# Altium PCB OFP_MCM_v1.62.PcbDoc (part 2 of 8)
Units mil, origin at the board's own origin, x right, y up, seen from the top; angles counter-clockwise.
Board outline 4330.71 x 4724.41 mil, 4 copper layers (Top Layer, Layer 1, Layer 2, Bottom Layer), stack 62.047 mil thick; 385 components, 287 nets, 1341 pads, 554 vias.
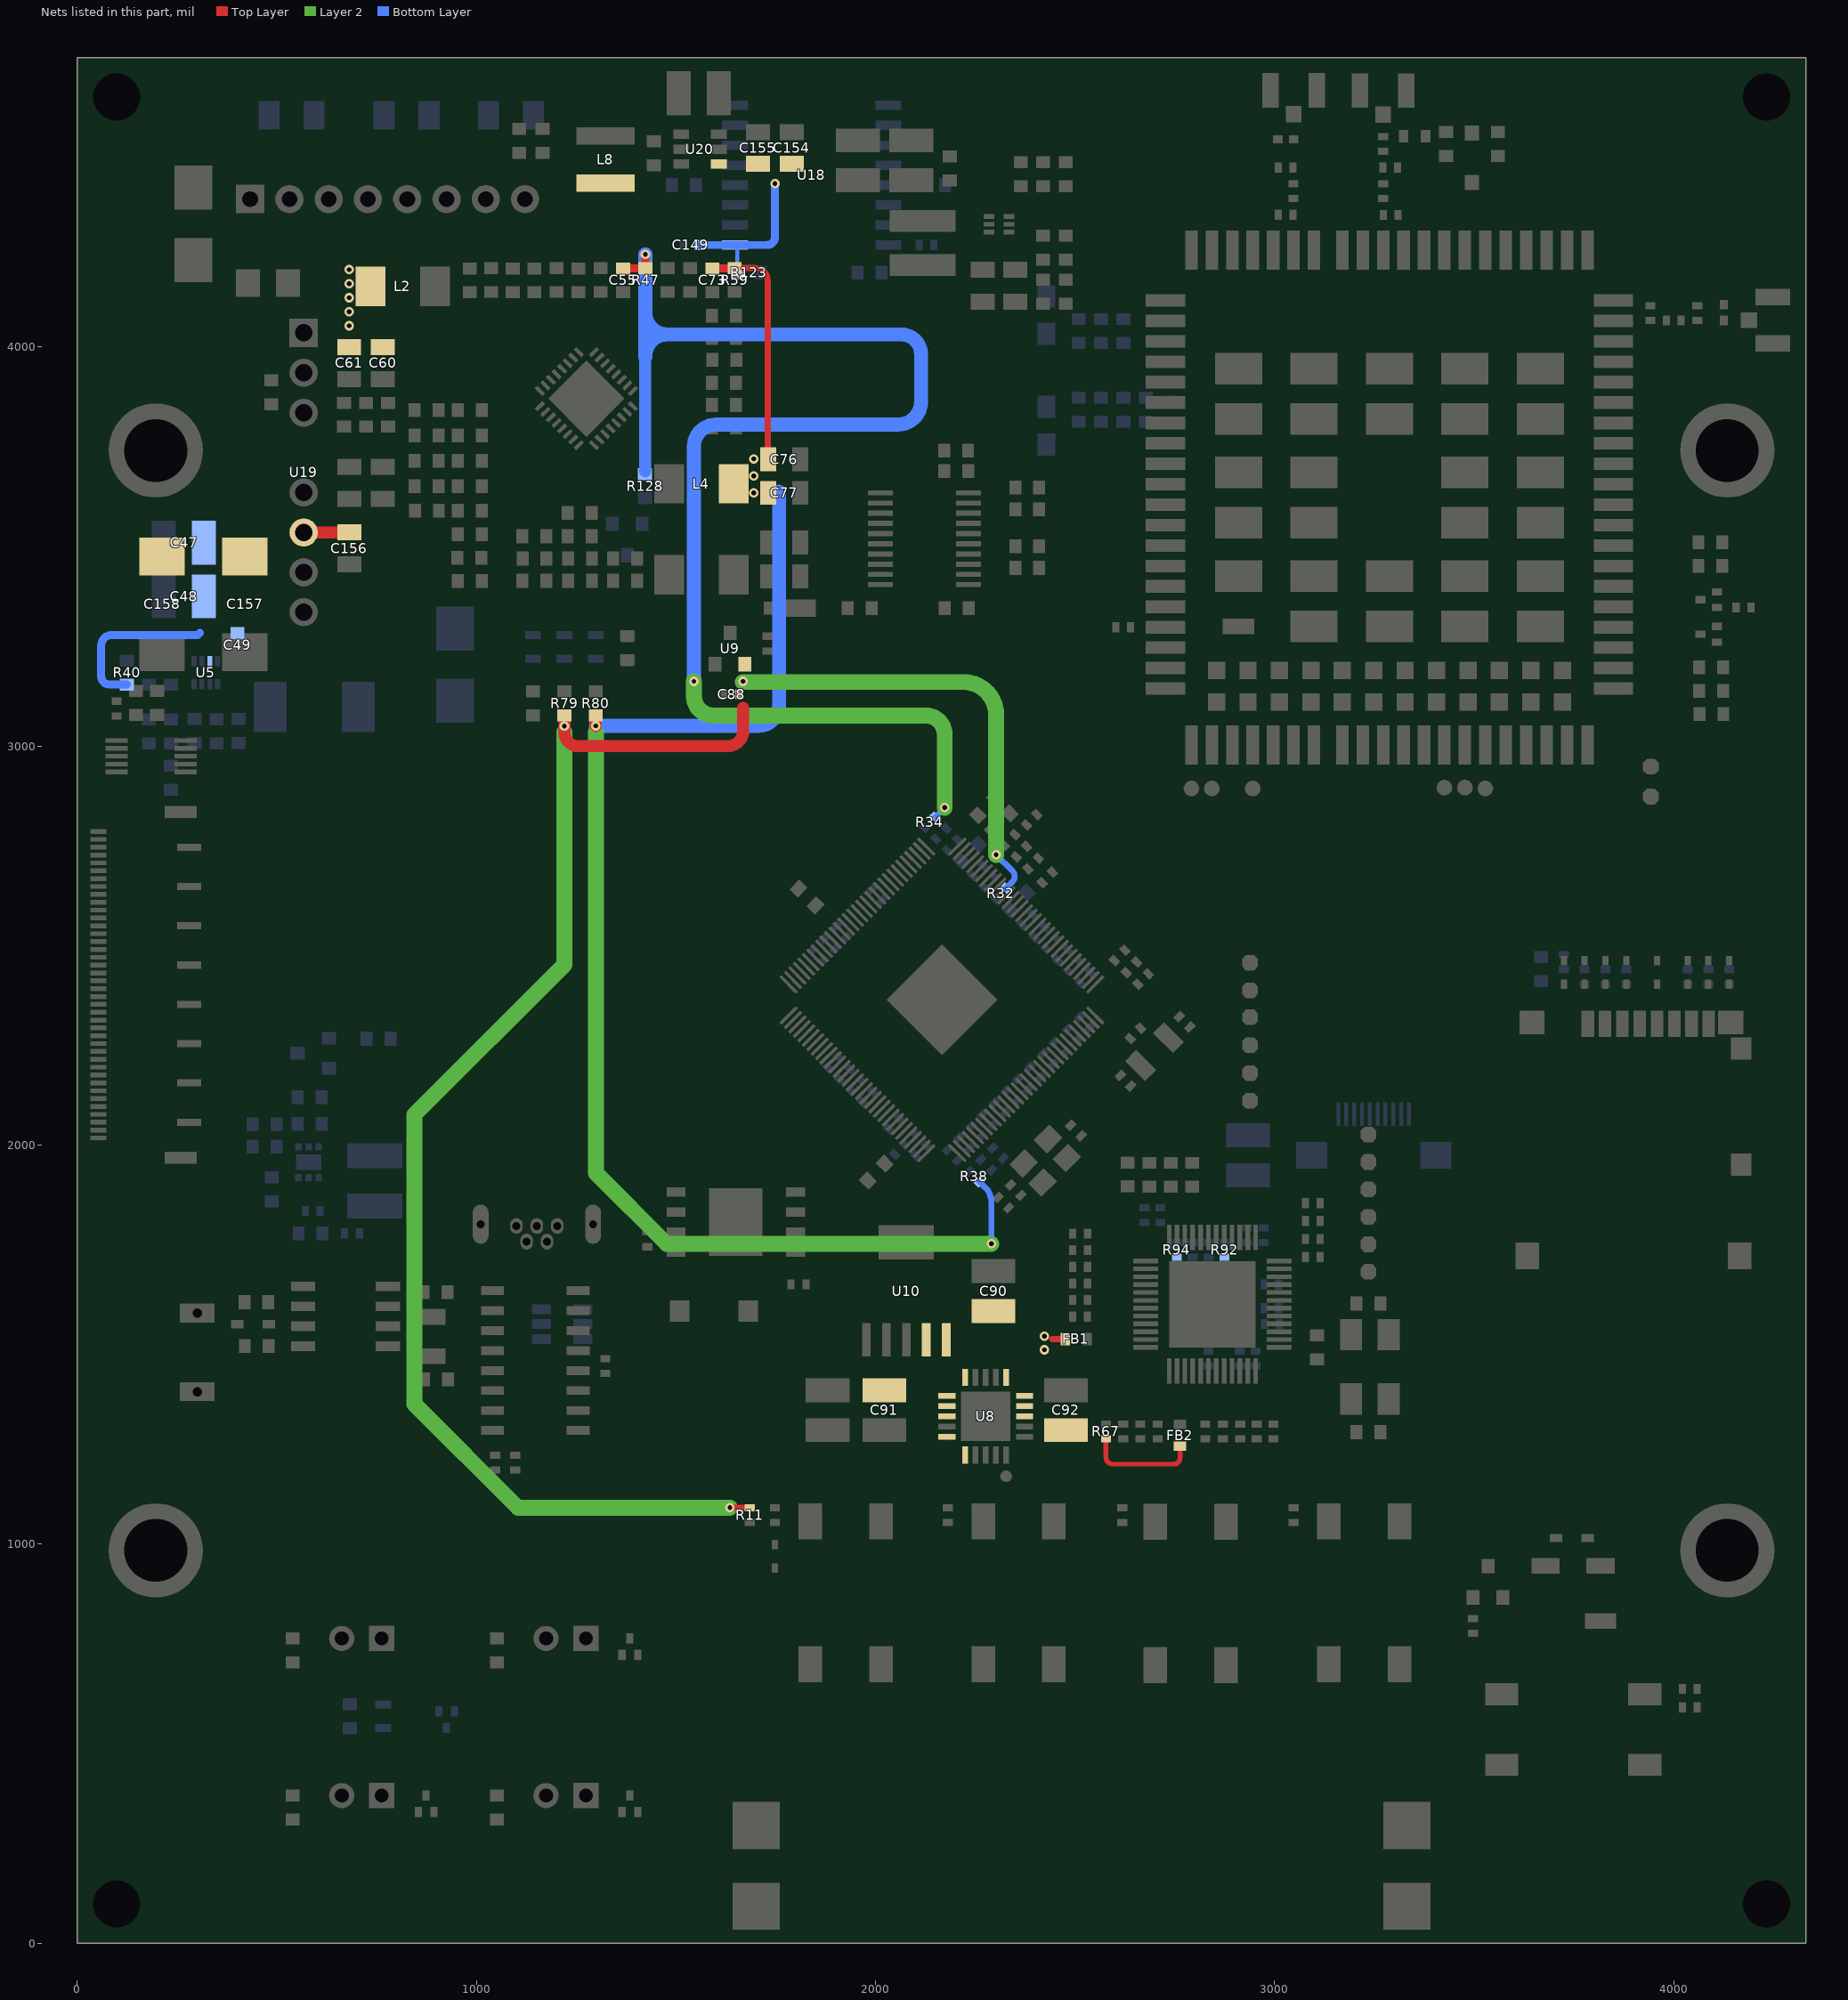
[diagram p4: the nets of this part, all layers, seen from the top]

## Part data
C1 C2 C5 C6: library part GJM1555C1H150FB01D, "CAP CER 15PF 50V C0G/NP0 0402", LCSC Part Number=C441742, Manufacturer=Murata, Temperature Coefficient=30ppm/°C, ComponentLink1Description=https://datasheet.ciiva.com/11608/c02e-11608383.pdf?src-supplier=Avnet, ComponentLink1URL=https://datasheet.ciiva.com/11608/c02e-11608383.pdf?src-supplier=Avnet, Item Type=Capacitors, Manufacturer Part Number=GJM1555C1H150FB01D, Material=4241ConductorMaterial, Pricing="1=0.15, 10=0.054, 50=0.054, 100=0.035, 1000=0.03, 10000=0.023 (USD)", RoHS=Yes, Stock=44169, Supplier=Mouser
C3 C17 C22 C23 C34 C38 C42 C45 C87 C88: library part GRM155R70J105KA12J, "CAP CER 1UF 6.3V X7R 0402", Case Code (Imperial)=0402, Case Code (Metric)=1005, Dielectric=X7R, LCSC Part Number=C2167130, Manufacturer=Murata, Max Operating Temperature=125°C, Min Operating Temperature=-55°C, Package Quantity=50000, Tolerance=10%, Voltage Rating=6.3V, Case/Package=0402, ComponentLink1Description=http://www.mouser.com/ds/2/281/c02e-2905.pdf?src-supplier=Mouser, ComponentLink1URL=http://www.mouser.com/ds/2/281/c02e-2905.pdf?src-supplier=Mouser, ComponentLink2Description=https://datasheet.octopart.com/GRM155R70J105KA12J-Murata-datasheet-32479577.pdf?src-supplier=Future+Electronics, ComponentLink2URL=https://datasheet.octopart.com/GRM155R70J105KA12J-Murata-datasheet-32479577.pdf?src-supplier=Future+Electronics, ComponentLink3Description=https://datasheet.octopart.com/GRM155R70J105KA12J-Murata-datasheet-155345054.pdf?src-supplier=Element14, ComponentLink3URL=https://datasheet.octopart.com/GRM155R70J105KA12J-Murata-datasheet-155345054.pdf?src-supplier=Element14, ComponentLink4Description=http://search.murata.co.jp/Ceramy/image/img/A01X/G101/ENG/GRM155R70J105KA12-01.pdf?src-supplier=Digikey, ComponentLink4URL=http://search.murata.co.jp/Ceramy/image/img/A01X/G101/ENG/GRM155R70J105KA12-01.pdf?src-supplier=Digikey, ComponentLink5Description=https://datasheet.octopart.com/GRM155R70J105KA12J-Murata-datasheet-165579666.pdf?src-supplier=TME, ComponentLink5URL=https://datasheet.octopart.com/GRM155R70J105KA12J-Murata-datasheet-165579666.pdf?src-supplier=TME, Height=550um, Item Type=Capacitors, Length=0.039inch, Manufacturer Part Number=GRM155R70J105KA12J, Material=4241ConductorMaterial, Mounting Technology="Surface Mount", Packaging="Tape and Reel", Pins=2NUMBER, Pricing="1=0.1, 10=0.01, 50=0.01, 100=0.008, 1000=0.008, 10000=0.007 (USD)", RoHS=Yes, RoHS Compliant=Yes, Series=GRM, Stock=273640, Supplier=Mouser, Termination=SMD/SMT, Thickness=0.022inch, Voltage Rating (DC)=6.3V, Weight=0.000212oz, Width=0.02inch
C4 C11 C16 C20 C33 C37 C41 C57 C58 C93 C94: library part GRM188Z71A106KA73D, "CAP CER 10UF 10V X7R 0603", Case/Package=345Case, LCSC Part Number=C2959727, Manufacturer=Murata, Max Operating Temperature=125°C, Min Operating Temperature=-55°C, Tolerance=10%, Voltage Rating=10V, ComponentLink1Description=https://datasheet.octopart.com/GRM188Z71A106KA73D-Murata-datasheet-165579666.pdf?src-supplier=TME, ComponentLink1URL=https://datasheet.octopart.com/GRM188Z71A106KA73D-Murata-datasheet-165579666.pdf?src-supplier=TME, Height=1mm, Item Type=Capacitor, Length=1.6mm, Manufacturer Part Number=GRM188Z71A106KA73D, Material=4241ConductorMaterial, Pricing="1=0.36, 10=0.155, 50=0.155, 100=0.104, 1000=0.094, 10000=0.065 (USD)", RoHS=Yes, RoHS Compliant=Yes, Stock=390983, Supplier=Mouser, Thickness=800um, Width=800um
C7 C12 C13 C14 C15 C18 C19 C24 C27 C28 C29 C30 C31 C35 C36 C39 C40 C43 C44 C46 C95 C97 C111 C114 C117 C120 C124 C127 C130 C133 C149 C150: library part GRM155R71E104KE14D, "CAP CER 0.1UF 25V X7R 0402", Case Code (Imperial)=0402, Case Code (Metric)=1005, Dielectric=X7R, Dielectric Material=Ceramic, LCSC Part Number=C77014, Manufacturer=Murata, Max Operating Temperature=125°C, Min Operating Temperature=-55°C, Package Quantity=10000, Tolerance=10%, Voltage=25V, Case/Package=0402, ComponentLink1Description=http://www.farnell.com/datasheets/1872206.pdf?src-supplier=Farnell, ComponentLink1URL=http://www.farnell.com/datasheets/1872206.pdf?src-supplier=Farnell, ComponentLink2Description=http://www.mouser.com/ds/2/281/c02e-2905.pdf?src-supplier=Mouser, ComponentLink2URL=http://www.mouser.com/ds/2/281/c02e-2905.pdf?src-supplier=Mouser, ComponentLink3Description=http://uk.rs-online.com/webdocs/144c/0900766b8144c113.pdf?src-supplier=Rs, ComponentLink3URL=http://uk.rs-online.com/webdocs/144c/0900766b8144c113.pdf?src-supplier=Rs, ComponentLink4Description=https://datasheet.octopart.com/GRM155R71E104KE14D-Murata-datasheet-62346597.pdf?src-supplier=Future+Electronics, ComponentLink4URL=https://datasheet.octopart.com/GRM155R71E104KE14D-Murata-datasheet-62346597.pdf?src-supplier=Future+Electronics, ComponentLink5Description=https://search.murata.co.jp/Ceramy/image/img/A01X/G101/ENG/GRM155R71E104KE14-01.pdf?src-supplier=Digikey, ComponentLink5URL=https://search.murata.co.jp/Ceramy/image/img/A01X/G101/ENG/GRM155R71E104KE14-01.pdf?src-supplier=Digikey, ComponentLink6Description=http://www.farnell.com/datasheets/2048008.pdf?src-supplier=Newark, ComponentLink6URL=http://www.farnell.com/datasheets/2048008.pdf?src-supplier=Newark, ComponentLink7Description=https://datasheet.octopart.com/GRM155R71E104KE14D-Murata-datasheet-62317124.pdf?src-supplier=Element14, ComponentLink7URL=https://datasheet.octopart.com/GRM155R71E104KE14D-Murata-datasheet-62317124.pdf?src-supplier=Element14, ComponentLink8Description=http://psearch.en.murata.com/capacitor/product/GRM155R71E104KE14%23.pdf?src-supplier=Avnet, ComponentLink8URL=http://psearch.en.murata.com/capacitor/product/GRM155R71E104KE14%23.pdf?src-supplier=Avnet, Depth=0.5mm, Height=0.5mm, Item Type=Capacitors, Lead Free=5697LeadFree, Length=1mm, Manufacturer Part Number=GRM155R71E104KE14D, Material=4241ConductorMaterial, Mounting Technology="Surface Mount", Packaging="Tape and Reel", Pins=2NUMBER, Pricing="1=0.1, 10=0.007, 50=0.007, 100=0.005, 1000=0.005, 10000=0.004 (USD)", Reach SVHC Compliant=Unknown, RoHS=Yes, RoHS Compliant=Yes, Series=GRM, Stock=652368, Supplier=Mouser, Termination=SMD/SMT, Thickness=0.022inch, Voltage Rating=25V, Voltage Rating (DC)=25V, Weight=0.000212oz, Width=0.02inch
C8: library part "SC EB 5R5 474 M", "0.47F -20%~+80% 5.5V", LCSC Part Number=C239004, Manufacturer=Wincap(Xingkai), Package=Custom, ComponentLink1Description=LCSC, ComponentLink1URL=https://item.szlcsc.com/238113.html, Item Type="Super Capaciitor", Manufacturer Part Number="SC EB 5R5 474 M"
C9 C49 C52 C53 C59 C75 C80 C83 C101 C106 C139 C140 C143 C151: library part GCJ188R71H104KA12D, "CAP CER 0.1UF 50V X7R 0603", Case Code (Imperial)=0603, Case Code (Metric)=1608, Dielectric=X7R, LCSC Part Number=C161115, Manufacturer=Murata, Max Operating Temperature=125°C, Min Operating Temperature=-55°C, Package Quantity=1, Ratings=AEC-Q200, Tolerance=10%, Voltage Rating=50V, Case/Package=0603, ComponentLink1Description=https://datasheet.ciiva.com/135/product-135604.pdf?src-supplier=Digikey, ComponentLink1URL=https://datasheet.ciiva.com/135/product-135604.pdf?src-supplier=Digikey, ComponentLink2Description=https://datasheet.ciiva.com/26889/getdatasheetpartid-369886-26889118.pdf?src-supplier=Verical, ComponentLink2URL=https://datasheet.ciiva.com/26889/getdatasheetpartid-369886-26889118.pdf?src-supplier=Verical, ComponentLink3Description=https://datasheet.ciiva.com/135/s0717e-135605.pdf?src-supplier=Digikey, ComponentLink3URL=https://datasheet.ciiva.com/135/s0717e-135605.pdf?src-supplier=Digikey, ComponentLink4Description=https://datasheet.ciiva.com/135/s0717e-135606.pdf?src-supplier=Digikey, ComponentLink4URL=https://datasheet.ciiva.com/135/s0717e-135606.pdf?src-supplier=Digikey, ComponentLink5Description=https://datasheet.ciiva.com/16440/c03e-16440425.pdf?src-supplier=Future+Electronics, ComponentLink5URL=https://datasheet.ciiva.com/16440/c03e-16440425.pdf?src-supplier=Future+Electronics, Construction=Flat, Depth=0.8mm, Features="Soft Termination", Height=0.8mm, Item Type=Capacitors, Lead Free=5697LeadFree, Length=1.6mm, Manufacturer Part Number=GCJ188R71H104KA12D, Material=4241ConductorMaterial, Mounting Technology="Surface Mount", Packaging="Tape and Reel", Pricing="1=0.13, 10=0.056, 50=0.056, 100=0.036, 1000=0.032, 10000=0.02 (USD)", Radiation Hardening=No, RoHS=Yes, RoHS Compliant=Yes, Series=GCJ, Stock=342536, Supplier=Mouser, Termination=SMD/SMT, Thickness=0.035inch, Voltage Rating (DC)=50V, Width=0.031inch
C10: library part GCM1885C2A120JA16D, "CAP CER 12PF 100V C0G/NP0 0603", Case Code (Imperial)=0603, Case Code (Metric)=1608, Dielectric=C0G, LCSC Part Number=C701298, Manufacturer=Murata, Max Operating Temperature=125°C, Min Operating Temperature=-55°C, Package Quantity=4000, Ratings=AEC-Q200, Tolerance=5%, Voltage Rating=100V, Capacitance=12pF, Case/Package=0603, Category="Ceramic Capacitors", ComponentLink1Description=https://datasheet.ciiva.com/26843/getdatasheetpartid-298064-26843669.pdf?src-supplier=Verical, ComponentLink1URL=https://datasheet.ciiva.com/26843/getdatasheetpartid-298064-26843669.pdf?src-supplier=Verical, ComponentLink2Description=https://datasheet.ciiva.com/29541/s0717e-29541093.pdf?src-supplier=Digi-Key, ComponentLink2URL=https://datasheet.ciiva.com/29541/s0717e-29541093.pdf?src-supplier=Digi-Key, ComponentLink3Description=https://datasheet.ciiva.com/29541/s0717e-29541094.pdf?src-supplier=Digi-Key, ComponentLink3URL=https://datasheet.ciiva.com/29541/s0717e-29541094.pdf?src-supplier=Digi-Key, ComponentLink4Description=https://datasheet.ciiva.com/29541/s0717e-29541095.pdf?src-supplier=Digi-Key, ComponentLink4URL=https://datasheet.ciiva.com/29541/s0717e-29541095.pdf?src-supplier=Digi-Key, Construction=Flat, Depth=0.8mm, Height=0.8mm, Item Type=Capacitor, Lead Free="Lead Free", Length=1.6mm, Manufacturer Part Number=GCM1885C2A120JA16D, Mount="Surface Mount", Packaging="Tape and Reel", Pricing 1="4000=0.02030, 8000=0.01800, 12000=0.01680, 28000=0.01670, 100000=0.01630 (USD)", Radiation Hardening=No, RoHS=Yes, RoHS Compliant=Yes, Series=GCM, Stock 1=12000, Supplier 1="Arrow Electronics", Supplier Part Number 1=GCM1885C2A120JA16D, Termination=SMD/SMT, Thickness=0.035inch, Voltage Rating (DC)=100V, Width=0.031inch
C21 C25: library part CL05A475MO5NUNC, "CAP CER 4.7UF 16V X5R 0402", Case Code (Imperial)=0402, Case Code (Metric)=1005, Manufacturer=Samsung, Max Operating Temperature=85°C, Min Operating Temperature=-55°C, Tolerance=20%, Voltage Rating=16V, Capacitance=4.7uF, Case/Package=0402, Category="Ceramic Capacitors", ComponentLink1Description=http://www.farnell.com/datasheets/2710653.pdf?src-supplier=Farnell, ComponentLink1URL=http://www.farnell.com/datasheets/2710653.pdf?src-supplier=Farnell, ComponentLink2Description=http://www.samsungsem.com/kr/support/product-search/mlcc/CL05A475MO5NUNC.jsp?src-supplier=Digikey, ComponentLink2URL=http://www.samsungsem.com/kr/support/product-search/mlcc/CL05A475MO5NUNC.jsp?src-supplier=Digikey, ComponentLink3Description=http://www.farnell.com/datasheets/2710653.pdf?src-supplier=Element14, ComponentLink3URL=http://www.farnell.com/datasheets/2710653.pdf?src-supplier=Element14, ComponentLink4Description=https://datasheet.octopart.com/CL05A475MO5NUNC-Samsung-Electro-Mechanics-datasheet-123102911.pdf?src-supplier=Future+Electronics, ComponentLink4URL=https://datasheet.octopart.com/CL05A475MO5NUNC-Samsung-Electro-Mechanics-datasheet-123102911.pdf?src-supplier=Future+Electronics, ComponentLink5Description=http://www.farnell.com/datasheets/2710653.pdf?src-supplier=Newark, ComponentLink5URL=http://www.farnell.com/datasheets/2710653.pdf?src-supplier=Newark, Height=550um, Length=0.039inch, Manufacturer Part Number=CL05A475MO5NUNC, Material=4241ConductorMaterial, Mount="Surface Mount", Packaging="Cut Tape", Pricing 1="10000=0.09712 (USD)", RoHS=Yes, RoHS Compliant=Yes, Series=CL, Stock 1=50000, Supplier 1=Avnet, Supplier Part Number 1=CL05A475MO5NUNC, Thickness=0.022inch, Voltage Rating (DC)=16V, Width=0.02inch
C26: library part GRM1555C1H102JA01D, "CAP CER 1000PF 50V C0G/NP0 0402", Case Code (Imperial)=0402, Case Code (Metric)=1005, Dielectric=C0G, Dielectric Material=Ceramic, Insulation Resistance=10GR, LCSC Part Number=C76947, Manufacturer=Murata, Max Operating Temperature=125°C, Min Operating Temperature=-55°C, Package Quantity=1, Temperature Coefficient=30ppm/°C, Tolerance=5%, Voltage=50V, Capacitance=1nF, Case/Package=0402, Category="Ceramic Capacitors", ComponentLink1Description=https://datasheet.ciiva.com/34302/1855908-34302849.pdf?src-supplier=Jameco, ComponentLink1URL=https://datasheet.ciiva.com/34302/1855908-34302849.pdf?src-supplier=Jameco, ComponentLink2Description=https://datasheet.ciiva.com/132/product-132800.pdf?src-supplier=Digi-Key, ComponentLink2URL=https://datasheet.ciiva.com/132/product-132800.pdf?src-supplier=Digi-Key, ComponentLink3Description=https://datasheet.ciiva.com/132/grm1555c1h102ja01-01-132799.pdf?src-supplier=Digi-Key, ComponentLink3URL=https://datasheet.ciiva.com/132/grm1555c1h102ja01-01-132799.pdf?src-supplier=Digi-Key, ComponentLink4Description=https://datasheet.ciiva.com/11786/0900766b807a1cab-11786727.pdf?src-supplier=RSComponents, ComponentLink4URL=https://datasheet.ciiva.com/11786/0900766b807a1cab-11786727.pdf?src-supplier=RSComponents, ComponentLink5Description=https://datasheet.ciiva.com/29200/453569-da-01-en-vs-kondensator-0402-29200121.pdf?src-supplier=Conrad, ComponentLink5URL=https://datasheet.ciiva.com/29200/453569-da-01-en-vs-kondensator-0402-29200121.pdf?src-supplier=Conrad, ComponentLink6Description=https://datasheet.ciiva.com/7828/4360-7828821.pdf?src-supplier=Element14, ComponentLink6URL=https://datasheet.ciiva.com/7828/4360-7828821.pdf?src-supplier=Element14, ComponentLink7Description=https://datasheet.ciiva.com/14116/grmseries-tc-hitype-eng-14116919.pdf?src-supplier=Distrelec, ComponentLink7URL=https://datasheet.ciiva.com/14116/grmseries-tc-hitype-eng-14116919.pdf?src-supplier=Distrelec, ComponentLink8Description=https://datasheet.ciiva.com/14116/grmseries-tc-hitype-eng-14116858.pdf?src-supplier=Distrelec, ComponentLink8URL=https://datasheet.ciiva.com/14116/grmseries-tc-hitype-eng-14116858.pdf?src-supplier=Distrelec, ComponentLink9Description=https://datasheet.ciiva.com/132/grm1555c1h102ja01-01-132801.pdf?src-supplier=Digi-Key, ComponentLink9URL=https://datasheet.ciiva.com/132/grm1555c1h102ja01-01-132801.pdf?src-supplier=Digi-Key, ComponentLink10Description=https://datasheet.ciiva.com/7828/1747436-7828822.pdf?src-supplier=Element14, ComponentLink10URL=https://datasheet.ciiva.com/7828/1747436-7828822.pdf?src-supplier=Element14, Construction=Flat, Depth=0.5mm, Height=0.5mm, Item Type=Capacitor, Lead Free="Lead Free", Length=1mm, Manufacturer Part Number=GRM1555C1H102JA01D, Material=Ceramic, Mount="Surface Mount", Number of Pins=2, Packaging="Tape and Reel", Pricing 1="10000=0.00648, 20000=0.00613, 40000=0.00578, 60000=0.00543, 80000=0.00508, 100000=0.00473, 1000000=0.00438 (USD)", Radiation Hardening=No, Reach SVHC Compliant=Yes, RoHS=Yes, RoHS Compliant=Yes, Series=GRM, Size=0.5mm, Stock 1=800000, Supplier 1=Avnet, Supplier Part Number 1=GRM1555C1H102JA01D, Termination=SMD/SMT, Thickness=0.022inch, Voltage Rating=50V, Voltage Rating (DC)=50V, Width=0.5mm
C32 C112 C115 C118 C121 C125 C128 C131 C134: library part GCM155R71H103JA55D, "CAP CER 10000PF 50V X7R 0402", Case Code (Imperial)=0402, Case Code (Metric)=1005, LCSC Part Number=C5189696, Manufacturer=Murata, Max Operating Temperature=125°C, Min Operating Temperature=-55°C, Ratings=AEC-Q200, Supplier Part Number=490-14352-2-ND, Tolerance=5%, Voltage Rating=50V, Case/Package=0402, Category="Ceramic Capacitors", ComponentLink1Description=http://search.murata.co.jp/Ceramy/image/img/A01X/partnumbering_e_02.pdf?src-supplier=Digikey, ComponentLink1URL=http://search.murata.co.jp/Ceramy/image/img/A01X/partnumbering_e_02.pdf?src-supplier=Digikey, ComponentLink2Description=http://search.murata.co.jp/Ceramy/image/img/A01X/G101/ENG/GCM155R71H103JA55-01.pdf?src-supplier=Digikey, ComponentLink2URL=http://search.murata.co.jp/Ceramy/image/img/A01X/G101/ENG/GCM155R71H103JA55-01.pdf?src-supplier=Digikey, Item Type=Capacitor, Manufacturer Part Number=GCM155R71H103JA55D, Mounting Technology="Surface Mount", Packaging="Cut Tape", RoHS=Yes, RoHS Compliant=Yes, Series=GCM, Supplier=Digikey
C47 C48 C78 C79 C89 C90 C91 C92 C104 C153: library part GRM32ER71H106KA12L, "CAP CER 10UF 50V X7R 1210", LCSC Part Number=C77102, Manufacturer=Murata, ComponentLink1Description=https://datasheet.ciiva.com/16497/product-16497010.pdf?src-supplier=Future+Electronics, ComponentLink1URL=https://datasheet.ciiva.com/16497/product-16497010.pdf?src-supplier=Future+Electronics, ComponentLink2Description=https://datasheet.ciiva.com/3777/4286grm32er71h106ka1223-3777306.pdf?src-supplier=Arrow+Electronics, ComponentLink2URL=https://datasheet.ciiva.com/3777/4286grm32er71h106ka1223-3777306.pdf?src-supplier=Arrow+Electronics, ComponentLink3Description=https://datasheet.ciiva.com/11789/0900766b80ef921d-11789081.pdf?src-supplier=Rs, ComponentLink3URL=https://datasheet.ciiva.com/11789/0900766b80ef921d-11789081.pdf?src-supplier=Rs, ComponentLink4Description=https://datasheet.ciiva.com/11607/c02e-11607596.pdf?src-supplier=Avnet, ComponentLink4URL=https://datasheet.ciiva.com/11607/c02e-11607596.pdf?src-supplier=Avnet, ComponentLink5Description=https://datasheet.ciiva.com/6270/partnumbering-e-01-6270167.pdf?src-supplier=Digikey, ComponentLink5URL=https://datasheet.ciiva.com/6270/partnumbering-e-01-6270167.pdf?src-supplier=Digikey, ComponentLink6Description=https://datasheet.ciiva.com/6270/partnumbering-e-01-6270168.pdf?src-supplier=Digikey, ComponentLink6URL=https://datasheet.ciiva.com/6270/partnumbering-e-01-6270168.pdf?src-supplier=Digikey, ComponentLink7Description=https://datasheet.ciiva.com/6270/partnumbering-e-01-6270169.pdf?src-supplier=Digikey, ComponentLink7URL=https://datasheet.ciiva.com/6270/partnumbering-e-01-6270169.pdf?src-supplier=Digikey, ComponentLink8Description=https://datasheet.ciiva.com/46441/1754714-46441340.pdf?src-supplier=Element14, ComponentLink8URL=https://datasheet.ciiva.com/46441/1754714-46441340.pdf?src-supplier=Element14, Item Type=Capacitors, Lead Free=5697LeadFree, Manufacturer Part Number=GRM32ER71H106KA12L, Pricing="1000=0.325, 2000=0.32, 3000=0.315, 4000=0.315, 5000=0.305 (USD)", RoHS=Yes, RoHS Compliant=5897YesNo, Stock=960000, Supplier="Future Electronics"
C50 C51: library part GRM21BZ71A226ME15L, "CAP CER 22UF 10V X7R 0805", LCSC Part Number=C907991, Manufacturer=Murata, Max Operating Temperature=125°C, Min Operating Temperature=-55°C, Package=0805, Supplier Part Number=490-GRM21BZ71A226ME15LCT-ND, Tolerance=20%, Voltage Rating=10V, Category="Ceramic Capacitors", ComponentLink1Description=https://datasheet.octopart.com/GRM21BZ71A226ME15L-Murata-datasheet-165579666.pdf?src-supplier=TME, ComponentLink1URL=https://datasheet.octopart.com/GRM21BZ71A226ME15L-Murata-datasheet-165579666.pdf?src-supplier=TME, ComponentLink2Description=LCSC, ComponentLink2URL=https://www.lcsc.com/product-detail/Multilayer-Ceramic-Capacitors-MLCC-SMD-SMT_Murata-Electronics-GRM21BZ71A226ME15L_C907991.html, Height=1.45mm, Item Type=Capacitor, Length=2mm, Manufacturer Part Number=GRM21BZ71A226ME15L, Material=4241ConductorMaterial, Pricing="1=0.39, 10=0.259, 50=0.191, 100=0.1556, 500=0.12282, 1000=0.10372 (USD)", RoHS=Yes, Stock=49126, Supplier=Digi-Key, Thickness=1.25mm, Width=1.25mm
C54 C65 C72: library part GCJ188R71H473KA12D, "CAP CER 0.047UF 50V X7R 0603", LCSC Part Number=C354386, Manufacturer=Murata, ComponentLink1Description=https://datasheet.ciiva.com/169/product-169143.pdf?src-supplier=Digikey, ComponentLink1URL=https://datasheet.ciiva.com/169/product-169143.pdf?src-supplier=Digikey, ComponentLink2Description=https://datasheet.ciiva.com/169/s0717e-169144.pdf?src-supplier=Digikey, ComponentLink2URL=https://datasheet.ciiva.com/169/s0717e-169144.pdf?src-supplier=Digikey, ComponentLink3Description=https://datasheet.ciiva.com/169/s0717e-169145.pdf?src-supplier=Digikey, ComponentLink3URL=https://datasheet.ciiva.com/169/s0717e-169145.pdf?src-supplier=Digikey, Item Type=Capacitors, Manufacturer Part Number=GCJ188R71H473KA12D, Pricing="1=0.19, 10=0.077, 50=0.077, 100=0.05, 1000=0.042, 10000=0.027 (USD)", RoHS=Yes, Stock=52710, Supplier=Mouser
C55: library part CC0603JRNPO9BN820, "CAP CER 82PF 50V C0G/NPO 0603", Case Code (Imperial)=0603, Case Code (Metric)=1608, Dielectric=C0G, Dielectric Material=Ceramic, Insulation Resistance=100GR, LCSC Part Number=C107056, Manufacturer=Yageo, Max Operating Temperature=125°C, Min Operating Temperature=-55°C, Package Quantity=1, Temperature Coefficient=30ppm/°C, Tolerance=5%, Voltage Rating=50V, Case/Package=0603, ComponentLink1Description=https://datasheet.ciiva.com/161/mlccorderingcode-161502.pdf?src-supplier=Digikey, ComponentLink1URL=https://datasheet.ciiva.com/161/mlccorderingcode-161502.pdf?src-supplier=Digikey, ComponentLink2Description=https://datasheet.ciiva.com/161/mlccorderingcode-161501.pdf?src-supplier=Digikey, ComponentLink2URL=https://datasheet.ciiva.com/161/mlccorderingcode-161501.pdf?src-supplier=Digikey, ComponentLink3Description=https://datasheet.ciiva.com/161/mlccorderingcode-161503.pdf?src-supplier=Digikey, ComponentLink3URL=https://datasheet.ciiva.com/161/mlccorderingcode-161503.pdf?src-supplier=Digikey, ComponentLink4Description=https://datasheet.ciiva.com/13386/upy-gp-np0-16v-to-50v-8-13386317.pdf?src-supplier=Mouser, ComponentLink4URL=https://datasheet.ciiva.com/13386/upy-gp-np0-16v-to-50v-8-13386317.pdf?src-supplier=Mouser, ComponentLink5Description=https://datasheet.ciiva.com/11465/upy-gp-np0-16v-to-50v-8-11465018.pdf?src-supplier=Avnet, ComponentLink5URL=https://datasheet.ciiva.com/11465/upy-gp-np0-16v-to-50v-8-11465018.pdf?src-supplier=Avnet, Depth=0.8mm, Halogen Free=5694HalogenFree, Height=0.8mm, Item Type=Capacitors, Lead Free="Lead Free", Length=1.6mm, Manufacturer Part Number=CC0603JRNPO9BN820, Mounting Technology="Surface Mount", Packaging="Tape and Reel", Pins=2, Radiation Hardening=No, Reach SVHC Compliant=No, RoHS=Yes, RoHS Compliant=Yes, Series=CC, Stock=2000, Supplier=Rs, Termination=SMD/SMT, Thickness=0.035inch, Voltage Rating (AC)=50V, Voltage Rating (DC)=50V, Width=0.031inch
C56: library part GCJ188R71H333KA12D, "CAP CER 0.033UF 50V X7R 0603", Case Code (Imperial)=0603, Case Code (Metric)=1608, Dielectric=X7R, LCSC Part Number=C2173059, Manufacturer=Murata, Max Operating Temperature=125°C, Min Operating Temperature=-55°C, Package Quantity=1, Ratings=AEC-Q200, Tolerance=10%, Voltage Rating=50V, Case/Package=0603, ComponentLink1Description=https://datasheet.ciiva.com/168/product-168891.pdf?src-supplier=Digikey, ComponentLink1URL=https://datasheet.ciiva.com/168/product-168891.pdf?src-supplier=Digikey, ComponentLink2Description=https://datasheet.ciiva.com/168/s0717e-168892.pdf?src-supplier=Digikey, ComponentLink2URL=https://datasheet.ciiva.com/168/s0717e-168892.pdf?src-supplier=Digikey, ComponentLink3Description=https://datasheet.ciiva.com/168/s0717e-168893.pdf?src-supplier=Digikey, ComponentLink3URL=https://datasheet.ciiva.com/168/s0717e-168893.pdf?src-supplier=Digikey, Depth=0.8mm, Features="Soft Termination", Item Type=Capacitors, Lead Free="Lead Free", Length=1.6mm, Manufacturer Part Number=GCJ188R71H333KA12D, Mounting Technology="Surface Mount", Packaging="Tape and Reel", Pricing="1=0.18, 10=0.072, 50=0.072, 100=0.047, 1000=0.039, 10000=0.027 (USD)", RoHS=Yes, RoHS Compliant=Yes, Series=GCJ, Stock=15481, Supplier=Mouser, Termination=SMD/SMT, Thickness=0.031inch, Voltage Rating (DC)=50V, Width=0.031inch
C60 C61 C67 C68 C76 C77 C81 C82 C154 C155: library part GRM21BZ70J226ME44L, "CAP CER 22UF 6.3V X7R 0805", Case/Package=339Case, LCSC Part Number=C1517827, Manufacturer=Murata, Max Operating Temperature=125°C, Min Operating Temperature=-55°C, Tolerance=20%, Voltage Rating=6.3V, Height=1.45mm, Item Type=Capacitors, Length=2mm, Manufacturer Part Number=GRM21BZ70J226ME44L, Material=4241ConductorMaterial, Pricing="1=0.41, 10=0.243, 50=0.243, 100=0.154, 1000=0.108, 10000=0.082 (USD)", RoHS=Yes, RoHS Compliant=Yes, Stock=88243, Supplier=Mouser, Thickness=1.25mm, Width=1.25mm
C62 C66 C69 C73 C85: library part GCM1885C2A220JA16D, "CAP CER 22PF 100V C0G/NP0 0603", LCSC Part Number=C408549, Manufacturer=Murata, Temperature Coefficient=30ppm/°C, Voltage Rating (DC)=100V, ComponentLink1Description=https://datasheet.ciiva.com/133/product-133320.pdf?src-supplier=Digikey, ComponentLink1URL=https://datasheet.ciiva.com/133/product-133320.pdf?src-supplier=Digikey, ComponentLink2Description=https://datasheet.ciiva.com/133/product-133318.pdf?src-supplier=Digikey, ComponentLink2URL=https://datasheet.ciiva.com/133/product-133318.pdf?src-supplier=Digikey, ComponentLink3Description=https://datasheet.ciiva.com/133/product-133319.pdf?src-supplier=Digikey, ComponentLink3URL=https://datasheet.ciiva.com/133/product-133319.pdf?src-supplier=Digikey, Item Type=Capacitors, Manufacturer Part Number=GCM1885C2A220JA16D, Material=4241ConductorMaterial, Pricing="1=0.1, 10=0.037, 50=0.037, 100=0.023, 1000=0.018, 10000=0.012 (USD)", RoHS=Yes, Stock=4861, Supplier=Mouser
C63: library part GCM1885C1H332FA16D, "CAP CER 3300PF 50V C0G/NP0 0603", Case/Package=345Case, LCSC Part Number=C3877267, Manufacturer=Murata, Max Operating Temperature=125°C, Min Operating Temperature=-55°C, Temperature Coefficient=30ppm/°C, Tolerance=1%, Voltage Rating=50V, ComponentLink1Description=https://datasheet.octopart.com/GCM1885C1H332FA16D-Murata-datasheet-12511495.pdf?src-supplier=TME, ComponentLink1URL=https://datasheet.octopart.com/GCM1885C1H332FA16D-Murata-datasheet-12511495.pdf?src-supplier=TME, Height=900um, Item Type=Capacitors, Length=1.6mm, Manufacturer Part Number=GCM1885C1H332FA16D, Material=4241ConductorMaterial, Pricing="1=0.19, 10=0.076, 50=0.076, 100=0.049, 1000=0.044, 10000=0.029 (USD)", RoHS=Yes, Stock=16626, Supplier=Mouser, Thickness=800um, Width=800um
C64 C98 C99: library part CC0603KRX7R9BB105, "CAP CER 1UF 50V X7R 0603", Case Code (Imperial)=0603, Case Code (Metric)=1608, Dielectric=X7R, LCSC Part Number=C559769, Manufacturer=Yageo, Max Operating Temperature=125°C, Min Operating Temperature=-55°C, Package Quantity=4000, Tolerance=10%, Voltage Rating=50V, Case/Package=0603, ComponentLink1Description=http://www.mouser.com/ds/2/447/Yageo_UPY-GP_NP0_16V-to-50V_9-358835.pdf?src-supplier=Mouser, ComponentLink1URL=http://www.mouser.com/ds/2/447/Yageo_UPY-GP_NP0_16V-to-50V_9-358835.pdf?src-supplier=Mouser, ComponentLink2Description=http://www.yageo.com/documents/recent/UPY-GPHC_X7R_6.3V-to-50V_18.pdf?src-supplier=Digikey, ComponentLink2URL=http://www.yageo.com/documents/recent/UPY-GPHC_X7R_6.3V-to-50V_18.pdf?src-supplier=Digikey, ComponentLink3Description=https://datasheet.octopart.com/CC0603KRX7R9BB105-Yageo-datasheet-137700082.pdf?src-supplier=Future+Electronics, ComponentLink3URL=https://datasheet.octopart.com/CC0603KRX7R9BB105-Yageo-datasheet-137700082.pdf?src-supplier=Future+Electronics, Halogen Free=5694HalogenFree, Height=900um, Item Type=Capacitors, Lead Free="Lead Free", Length=0.063inch, Manufacturer Part Number=CC0603KRX7R9BB105, Material=4241ConductorMaterial, Mounting Technology="Surface Mount", Packaging="Tape and Reel", RoHS=Yes, RoHS Compliant=Yes, Series=CC, Stock=950, Supplier=Rs, Termination=SMD/SMT, Thickness=0.035inch, Voltage Rating (DC)=50V, Weight=7.1E-05oz, Width=0.031inch
C70 C86: library part GRM1885C1H222JA01D, "CAP CER 2200PF 50V C0G/NP0 0603", Case Code (Imperial)=0603, Case Code (Metric)=1608, Dielectric=C0G, Dielectric Material=Ceramic, Insulation Resistance=10GR, LCSC Part Number=C77033, Manufacturer=Murata, Max Operating Temperature=125°C, Min Operating Temperature=-55°C, Package Quantity=1, Temperature Coefficient=30ppm/°C, Tolerance=5%, Voltage=50V, Case/Package=0603, ComponentLink1Description=https://datasheet.ciiva.com/11786/0900766b807a1cab-11786840.pdf?src-supplier=Rs, ComponentLink1URL=https://datasheet.ciiva.com/11786/0900766b807a1cab-11786840.pdf?src-supplier=Rs, ComponentLink2Description=https://datasheet.ciiva.com/3777/1632grm1885c1h222ja0123-3777835.pdf?src-supplier=Arrow+Electronics, ComponentLink2URL=https://datasheet.ciiva.com/3777/1632grm1885c1h222ja0123-3777835.pdf?src-supplier=Arrow+Electronics, ComponentLink3Description=https://datasheet.ciiva.com/6031/4360-6031797.pdf?src-supplier=Farnell, ComponentLink3URL=https://datasheet.ciiva.com/6031/4360-6031797.pdf?src-supplier=Farnell, ComponentLink4Description=https://datasheet.ciiva.com/7828/4360-7828918.pdf?src-supplier=Element14, ComponentLink4URL=https://datasheet.ciiva.com/7828/4360-7828918.pdf?src-supplier=Element14, ComponentLink5Description=https://datasheet.ciiva.com/133/partnumbering-e-01-133577.pdf?src-supplier=Digikey, ComponentLink5URL=https://datasheet.ciiva.com/133/partnumbering-e-01-133577.pdf?src-supplier=Digikey, ComponentLink6Description=https://datasheet.ciiva.com/133/partnumbering-e-01-133576.pdf?src-supplier=Digikey, ComponentLink6URL=https://datasheet.ciiva.com/133/partnumbering-e-01-133576.pdf?src-supplier=Digikey, ComponentLink7Description=https://datasheet.ciiva.com/133/partnumbering-e-01-133578.pdf?src-supplier=Digikey, ComponentLink7URL=https://datasheet.ciiva.com/133/partnumbering-e-01-133578.pdf?src-supplier=Digikey, ComponentLink8Description=https://datasheet.ciiva.com/7828/1747455-7828919.pdf?src-supplier=Element14, ComponentLink8URL=https://datasheet.ciiva.com/7828/1747455-7828919.pdf?src-supplier=Element14, ComponentLink9Description=https://datasheet.ciiva.com/7828/1747455-7828920.pdf?src-supplier=Element14, ComponentLink9URL=https://datasheet.ciiva.com/7828/1747455-7828920.pdf?src-supplier=Element14, ComponentLink10Description=https://datasheet.ciiva.com/11463/product-11463974.pdf?src-supplier=Avnet, ComponentLink10URL=https://datasheet.ciiva.com/11463/product-11463974.pdf?src-supplier=Avnet, ComponentLink11Description=https://datasheet.ciiva.com/2989/product-2989459.pdf?src-supplier=Avnet, ComponentLink11URL=https://datasheet.ciiva.com/2989/product-2989459.pdf?src-supplier=Avnet, ComponentLink12Description=https://datasheet.ciiva.com/29241/450664-da-01-en-vs-kondensator-0603-29241770.pdf?src-supplier=Conrad, ComponentLink12URL=https://datasheet.ciiva.com/29241/450664-da-01-en-vs-kondensator-0603-29241770.pdf?src-supplier=Conrad, Construction=Flat, Depth=0.8mm, Height=0.8mm, Item Type=Capacitors, Lead Free="Lead Free", Length=1.6mm, Manufacturer Part Number=GRM1885C1H222JA01D, Material=Ceramic, Mounting Technology="Surface Mount", Packaging="Tape and Reel", Pins=2, Pricing="1=0.1, 10=0.031, 50=0.031, 100=0.019, 1000=0.015, 10000=0.008 (USD)", Reach SVHC Compliant=No, RoHS=Yes, RoHS Compliant=Yes, Series=GRM, Stock=93842, Supplier=Mouser, Termination=SMD/SMT, Thickness=0.035inch, Voltage Rating=50V, Voltage Rating (DC)=50V, Width=0.031inch
C71 C74 C84: library part GRM1885C1H103JA01D, "CAP CER 10000PF 50V C0G/NP0 0603", Capacitance=10nF, Case Code (Imperial)=0603, Case Code (Metric)=1608, Dielectric=C0G, Manufacturer=Murata, Max Operating Temperature=125°C, Min Operating Temperature=-55°C, Package Quantity=4000, Supplier Part Number 1=1449032, Tolerance=5%, Voltage=50V, Case/Package=0603, Category="Ceramic Capacitors", ComponentLink1Description=https://datasheet.ciiva.com/41860/partnumbering-e-01-41860759.pdf?src-supplier=Digi-Key, ComponentLink1URL=https://datasheet.ciiva.com/41860/partnumbering-e-01-41860759.pdf?src-supplier=Digi-Key, ComponentLink2Description=https://datasheet.ciiva.com/29537/partnumbering-e-01-29537910.pdf?src-supplier=Digi-Key, ComponentLink2URL=https://datasheet.ciiva.com/29537/partnumbering-e-01-29537910.pdf?src-supplier=Digi-Key, Depth=0.8mm, Height=0.8mm, Lead Free="Lead Free", Lead Pitch=0.5mm, Length=1.6mm, Manufacturer Part Number=GRM1885C1H103JA01D, Material=Ceramic, Mount="Surface Mount", Packaging="Tape and Reel", Pricing 1="4000=0.03500, 8000=0.03200 (GBP)", REACH SVHC="No SVHC", RoHS=Yes, RoHS Compliant=Yes, Series=GRM, Stock 1=80000, Supplier 1=RSComponents, Termination=SMD/SMT, Thickness=0.035inch, Voltage Rating=50V, Voltage Rating (DC)=50V, Width=0.8mm
C96: library part CC0603KRX7R7BB225, "CAP CER 2.2UF 16V X7R 0603", Case Code (Imperial)=0603, Case Code (Metric)=1608, Dielectric=1511DielectricType, LCSC Part Number=C914769, Manufacturer=Yageo, Max Operating Temperature=125°C, Min Operating Temperature=-55°C, Tolerance=10%, Voltage Rating=16V, Case/Package=0603, ComponentLink1Description=https://datasheet.octopart.com/CC0603KRX7R7BB225-Yageo-datasheet-166511530.pdf?src-supplier=Future+Electronics, ComponentLink1URL=https://datasheet.octopart.com/CC0603KRX7R7BB225-Yageo-datasheet-166511530.pdf?src-supplier=Future+Electronics, ComponentLink2Description=http://www.yageo.com/documents/recent/UPY-GPHC_X7R_6.3V-to-50V_18.pdf?src-supplier=Digikey, ComponentLink2URL=http://www.yageo.com/documents/recent/UPY-GPHC_X7R_6.3V-to-50V_18.pdf?src-supplier=Digikey, ComponentLink3Description=https://datasheet.octopart.com/CC0603KRX7R7BB225-Yageo-datasheet-151948686.pdf?src-supplier=Farnell, ComponentLink3URL=https://datasheet.octopart.com/CC0603KRX7R7BB225-Yageo-datasheet-151948686.pdf?src-supplier=Farnell, Halogen Free=5694HalogenFree, Height=900um, Item Type=Capacitors, Lead Free=5697LeadFree, Manufacturer Part Number=CC0603KRX7R7BB225, Material=4241ConductorMaterial, Mounting Technology="Surface Mount", Packaging="Cut Tape", Pricing="4000=0.0676, 8000=0.0665, 12000=0.0658, 16000=0.0654, 20000=0.0639 (USD)", RoHS=Yes, RoHS Compliant=Yes, Series=CC, Stock=100000, Supplier="Future Electronics", Voltage Rating (DC)=16V
C100 C105: library part T490A107M006ATE800, "CAP TANT 100UF 20% 6V 1206", Case Code (Imperial)=1206, Case Code (Metric)=3216, ESR (Equivalent Series Resistance)=800mR, LCSC Part Number=C122251, Manufacturer=KEMET, Max Operating Temperature=125°C, Min Operating Temperature=-55°C, Tolerance=20%, Voltage Rating=6.3V, Case/Package=1206, ComponentLink1Description=http://www.farnell.com/datasheets/2319485.pdf?src-supplier=Farnell, ComponentLink1URL=http://www.farnell.com/datasheets/2319485.pdf?src-supplier=Farnell, ComponentLink2Description=https://datasheet.octopart.com/T490A107M006ATE800-KEMET-datasheet-68586799.pdf?src-supplier=Newark, ComponentLink2URL=https://datasheet.octopart.com/T490A107M006ATE800-KEMET-datasheet-68586799.pdf?src-supplier=Newark, ComponentLink3Description=https://datasheet.octopart.com/T490A107M006ATE800-KEMET-datasheet-85394776.pdf?src-supplier=Element14, ComponentLink3URL=https://datasheet.octopart.com/T490A107M006ATE800-KEMET-datasheet-85394776.pdf?src-supplier=Element14, ComponentLink4Description=https://api.kemet.com/component-edge/download/datasheet/T490A107M006ATE800.pdf?src-supplier=Digikey, ComponentLink4URL=https://api.kemet.com/component-edge/download/datasheet/T490A107M006ATE800.pdf?src-supplier=Digikey, ComponentLink5Description=http://capacitoredge.kemet.com/capedge2/DataSheet/Datasheet-T490A107M006ATE800.pdf?pn=T490A107M006ATE800&src-supplier=Avnet, ComponentLink5URL=http://capacitoredge.kemet.com/capedge2/DataSheet/Datasheet-T490A107M006ATE800.pdf?pn=T490A107M006ATE800&src-supplier=Avnet, ComponentLink6Description=https://datasheet.octopart.com/T490A107M006ATE800-KEMET-datasheet-181972689.pdf?src-supplier=Farnell, ComponentLink6URL=https://datasheet.octopart.com/T490A107M006ATE800-KEMET-datasheet-181972689.pdf?src-supplier=Farnell, Construction=Flat, Features="General Purpose", Height=1.6mm, Item Type=Capacitors, Length=3.2mm, Manufacturer Part Number=T490A107M006ATE800, Mounting Technology="Surface Mount", Packaging="Cut Tape", Pricing="1=0.7, 10=0.375, 50=0.375, 100=0.319, 1000=0.263, 10000=0.25 (USD)", RoHS=Yes, RoHS Compliant=Yes, Series=T490, Stock=905, Supplier=Mouser
C102 C107: library part GCM1885C2A330JA16D, "CAP CER 33PF 100V C0G/NP0 0603", Case Code (Imperial)=0603, Case Code (Metric)=1608, Dielectric=C0G, LCSC Part Number=C126578, Manufacturer=Murata, Max Operating Temperature=125°C, Min Operating Temperature=-55°C, Package Quantity=1, Ratings=AEC-Q200, Tolerance=5%, Voltage Rating=100V, Case/Package=0603, ComponentLink1Description=https://datasheet.ciiva.com/161/product-161815.pdf?src-supplier=Digikey, ComponentLink1URL=https://datasheet.ciiva.com/161/product-161815.pdf?src-supplier=Digikey, ComponentLink2Description=https://datasheet.ciiva.com/161/product-161814.pdf?src-supplier=Digikey, ComponentLink2URL=https://datasheet.ciiva.com/161/product-161814.pdf?src-supplier=Digikey, ComponentLink3Description=https://datasheet.ciiva.com/161/product-161816.pdf?src-supplier=Digikey, ComponentLink3URL=https://datasheet.ciiva.com/161/product-161816.pdf?src-supplier=Digikey, ComponentLink4Description=https://datasheet.ciiva.com/11606/product-11606732.pdf?src-supplier=Avnet, ComponentLink4URL=https://datasheet.ciiva.com/11606/product-11606732.pdf?src-supplier=Avnet, Construction=Flat, Depth=0.8mm, Height=0.8mm, Item Type=Capacitors, Length=1.6mm, Manufacturer Part Number=GCM1885C2A330JA16D, Mounting Technology="Surface Mount", Packaging="Tape and Reel", Pricing="1=0.1, 10=0.03, 50=0.03, 100=0.022, 1000=0.017, 10000=0.011 (USD)", Radiation Hardening=No, RoHS=Yes, RoHS Compliant=Yes, Series=GCM, Stock=24199, Supplier=Mouser, Termination=SMD/SMT, Thickness=0.035inch, Voltage Rating (DC)=100V, Width=0.031inch
C103 C108: library part CC0603JRNPO9BN100, "CAP CER 10PF 50V C0G/NPO 0603", Case Code (Imperial)=0603, Case Code (Metric)=1608, Dielectric=C0G, Insulation Resistance=100GR, LCSC Part Number=C106245, Manufacturer=Yageo, Max Operating Temperature=125°C, Min Operating Temperature=-55°C, Package Quantity=1, Resistor Type=Ceramic, Supplier Part Number 1=311-1058-1-ND, Temperature Coefficient=30ppm/°C, Tolerance=5%, Voltage=50V, Capacitance=10pF, Case/Package=0603, Category="Ceramic Capacitors", ComponentLink1Description=https://datasheet.ciiva.com/25787/cl10a475ka8nqnc-25787017.pdf?src-supplier=Digi-Key, ComponentLink1URL=https://datasheet.ciiva.com/25787/cl10a475ka8nqnc-25787017.pdf?src-supplier=Digi-Key, ComponentLink2Description=https://datasheet.ciiva.com/144/mlccorderingcode-144651.pdf?src-supplier=Digi-Key, ComponentLink2URL=https://datasheet.ciiva.com/144/mlccorderingcode-144651.pdf?src-supplier=Digi-Key, ComponentLink3Description=https://datasheet.ciiva.com/11786/0900766b8079c870-11786407.pdf?src-supplier=RSComponents, ComponentLink3URL=https://datasheet.ciiva.com/11786/0900766b8079c870-11786407.pdf?src-supplier=RSComponents, ComponentLink4Description=https://datasheet.ciiva.com/5789/1734582-5789616.pdf?src-supplier=Farnell, ComponentLink4URL=https://datasheet.ciiva.com/5789/1734582-5789616.pdf?src-supplier=Farnell, ComponentLink5Description=https://datasheet.ciiva.com/26862/getdatasheetpartid-403524-26862758.pdf?src-supplier=Verical, ComponentLink5URL=https://datasheet.ciiva.com/26862/getdatasheetpartid-403524-26862758.pdf?src-supplier=Verical, ComponentLink6Description=https://datasheet.ciiva.com/7978/1132289-7978126.pdf?src-supplier=Element14, ComponentLink6URL=https://datasheet.ciiva.com/7978/1132289-7978126.pdf?src-supplier=Element14, ComponentLink7Description=https://datasheet.ciiva.com/46430/1835847-46430150.pdf?src-supplier=Element14, ComponentLink7URL=https://datasheet.ciiva.com/46430/1835847-46430150.pdf?src-supplier=Element14, ComponentLink8Description=https://datasheet.ciiva.com/144/mlccorderingcode-144650.pdf?src-supplier=Digi-Key, ComponentLink8URL=https://datasheet.ciiva.com/144/mlccorderingcode-144650.pdf?src-supplier=Digi-Key, ComponentLink9Description=https://datasheet.ciiva.com/144/mlccorderingcode-144649.pdf?src-supplier=Digi-Key, ComponentLink9URL=https://datasheet.ciiva.com/144/mlccorderingcode-144649.pdf?src-supplier=Digi-Key, ComponentLink10Description=https://datasheet.ciiva.com/5425/upy-gp-np0-16v-to-50v-8-5425564.pdf?src-supplier=Mouser, ComponentLink10URL=https://datasheet.ciiva.com/5425/upy-gp-np0-16v-to-50v-8-5425564.pdf?src-supplier=Mouser, ComponentLink11Description=https://datasheet.ciiva.com/8033/1734582-8033710.pdf?src-supplier=Element14, ComponentLink11URL=https://datasheet.ciiva.com/8033/1734582-8033710.pdf?src-supplier=Element14, ComponentLink12Description=https://datasheet.ciiva.com/8033/1734582-8033706.pdf?src-supplier=Element14, ComponentLink12URL=https://datasheet.ciiva.com/8033/1734582-8033706.pdf?src-supplier=Element14, Depth=0.8mm, Height=0.8mm, Lead Free="Lead Free", Length=1.6mm, Manufacturer Part Number=CC0603JRNPO9BN100, Mount="Surface Mount", Number of Pins=2, Packaging="Tape and Reel", Pricing 1="1=0.10000, 10=0.03900, 50=0.02120, 100=0.01740, 500=0.01240, 1000=0.00974 (USD)", Radiation Hardening=No, REACH SVHC="No SVHC", RoHS=Yes, RoHS Compliant=Yes, Series=CC, Stock 1=1700978, Supplier 1=Digi-Key, Termination=SMD/SMT, Thickness=0.035inch, Voltage Rating=50V, Voltage Rating (DC)=50V, Width=0.031inch
C109 C110: library part CC0603JRNPO9BN300, "CAP 30pF NP0 0603 50 V ±5 % SMD", Case Code (Imperial)=0603, Case Code (Metric)=1608, Dielectric=C0G, Insulation Resistance=10GR, LCSC Part Number=C113797, Manufacturer=Yageo, Max Operating Temperature=125°C, Min Operating Temperature=-55°C, Resistor Type=Ceramic, Supplier Part Number 1=311-3357-1-ND, Tolerance=5%, Voltage Rating=50V, Capacitance=30pF, Case/Package=0603, Category="Ceramic Capacitors", ComponentLink1Description=https://datasheet.ciiva.com/26862/getdatasheetpartid-403531-26862766.pdf?src-supplier=Verical, ComponentLink1URL=https://datasheet.ciiva.com/26862/getdatasheetpartid-403531-26862766.pdf?src-supplier=Verical, ComponentLink2Description=https://datasheet.ciiva.com/13264/upy-gp-np0-16v-to-50v-8-3714-13264406.pdf?src-supplier=Mouser, ComponentLink2URL=https://datasheet.ciiva.com/13264/upy-gp-np0-16v-to-50v-8-3714-13264406.pdf?src-supplier=Mouser, ComponentLink3Description=https://datasheet.ciiva.com/7978/1132289-7978140.pdf?src-supplier=Element14, ComponentLink3URL=https://datasheet.ciiva.com/7978/1132289-7978140.pdf?src-supplier=Element14, ComponentLink4Description=https://datasheet.ciiva.com/28450/1443161-28450494.pdf?src-supplier=Element14, ComponentLink4URL=https://datasheet.ciiva.com/28450/1443161-28450494.pdf?src-supplier=Element14, Construction=Flat, Depth=0.8mm, Dissipation Factor=0.1%, Height=0.8mm, Lead Free="Lead Free", Length=1.6mm, Manufacturer Part Number=CC0603JRNPO9BN300, Mount="Surface Mount", Number of Pins=2, Packaging="Tape and Reel", Pricing 1="1=0.10000, 10=0.06800, 50=0.03700, 100=0.03020, 500=0.02160, 1000=0.01697 (USD)", Radiation Hardening=No, REACH SVHC="No SVHC", RoHS=Yes, RoHS Compliant=Yes, Series=CC, Stock 1=36700, Supplier 1=Digi-Key, Termination=SMD/SMT, Thickness=0.035inch, Voltage Rating (DC)=50V, Weight=7.1E-05oz, Width=0.031inch
C113 C116 C119 C122 C126 C129 C132 C135: library part CC0402KRX7R8BB102, "CAP CER 1000PF 25V X7R 0402", Case Code (Imperial)=0402, Case Code (Metric)=1005, Dielectric=X7R, Insulation Resistance=10GR, LCSC Part Number=C541372, Manufacturer=Yageo, Max Operating Temperature=125°C, Min Operating Temperature=-55°C, Tolerance=10%, Voltage Rating=25V, Capacitance=1nF, Case/Package=0402, Category="Ceramic Capacitors", ComponentLink1Description=https://datasheet.ciiva.com/26862/getdatasheetpartid-639817-26862638.pdf?src-supplier=Verical, ComponentLink1URL=https://datasheet.ciiva.com/26862/getdatasheetpartid-639817-26862638.pdf?src-supplier=Verical, ComponentLink2Description=https://datasheet.ciiva.com/5425/upy-gp-np0-16v-to-50v-8-3714-5425527.pdf?src-supplier=Mouser, ComponentLink2URL=https://datasheet.ciiva.com/5425/upy-gp-np0-16v-to-50v-8-3714-5425527.pdf?src-supplier=Mouser, Depth=0.5mm, Dissipation Factor=2.5%, Halogen Free="Halogen Free", Item Type=Capacitor, Lead Free="Lead Free", Length=1mm, Manufacturer Part Number=CC0402KRX7R8BB102, Mount="Surface Mount", Number of Pins=2, Packaging="Tape and Reel", Pricing 1="1=0.00230, 10000=0.00230, 100001=0.00190 (USD)", Radiation Hardening=No, RoHS=Yes, RoHS Compliant=Yes, Series=CC, Stock 1=370000, Supplier 1="Arrow Electronics", Supplier Part Number 1=CC0402KRX7R8BB102, Termination=SMD/SMT, Thickness=0.022inch, Voltage Rating (DC)=25V, Width=0.02inch
C123: library part CC0402KRX5R8BB105, "CAP CER 1UF 25V X5R 0402", Case Code (Imperial)=0402, Case Code (Metric)=1005, Dielectric=X5R, LCSC Part Number=C326568, Manufacturer=Yageo, Max Operating Temperature=85°C, Min Operating Temperature=-55°C, Package Quantity=10000, Supplier Part Number 1=603-CC402KRX5R8BB105, Tolerance=10%, Voltage Rating=25V, Capacitance=1uF, Case/Package=0402, Category="Ceramic Capacitors", ComponentLink1Description=http://www.mouser.com/ds/2/447/Yageo_UPY-GP_NP0_16V-to-50V_9-358835.pdf?src-supplier=Mouser, ComponentLink1URL=http://www.mouser.com/ds/2/447/Yageo_UPY-GP_NP0_16V-to-50V_9-358835.pdf?src-supplier=Mouser, ComponentLink2Description=http://www.yageo.com/documents/recent/UPY-GPHC_X5R_4V-to-50V_25.pdf?src-supplier=Digi-Key, ComponentLink2URL=http://www.yageo.com/documents/recent/UPY-GPHC_X5R_4V-to-50V_25.pdf?src-supplier=Digi-Key, ComponentLink3Description=https://4donline.ihs.com/images/VipMasterIC/IC/YAGO/YAGO-S-A0006851646/YAGO-S-A0006851646-1.pdf?hkey=6D3A4C79FDBF58556ACFDE234799DDF0&src-supplier=Newark, ComponentLink3URL=https://4donline.ihs.com/images/VipMasterIC/IC/YAGO/YAGO-S-A0006851646/YAGO-S-A0006851646-1.pdf?hkey=6D3A4C79FDBF58556ACFDE234799DDF0&src-supplier=Newark, Halogen Free="Halogen Free", Lead Free="Lead Free", Length=0.039inch, Manufacturer Part Number=CC0402KRX5R8BB105, Mount="Surface Mount", Packaging="Tape and Reel", Pricing 1="1=0.30000, 10=0.20400, 50=0.20400, 100=0.11600, 1000=0.07200, 10000=0.05900 (USD)", RoHS=Yes, RoHS Compliant=Yes, Stock 1=91975, Supplier 1=Mouser, Termination=SMD/SMT, Thickness=0.022inch, Voltage Rating (DC)=25V, Weight=2.3E-05oz, Width=0.02inch
C136: library part CC0402MRX5R6BB106, "CAP CER 10UF 10V X5R 0402", Case Code (Imperial)=0402, Case Code (Metric)=1005, LCSC Part Number=C962143, Manufacturer=Yageo, Max Operating Temperature=85°C, Min Operating Temperature=-55°C, Supplier Part Number 1=6097631, Tolerance=20%, Voltage Rating=10V, Capacitance=10uF, Case/Package=0402, Category="Ceramic Capacitors", ComponentLink1Description=http://www.yageo.com/documents/recent/UPY-GPHC_X5R_4V-to-50V_25.pdf?src-supplier=Digi-Key, ComponentLink1URL=http://www.yageo.com/documents/recent/UPY-GPHC_X5R_4V-to-50V_25.pdf?src-supplier=Digi-Key, Item Type=Capacitor, Manufacturer Part Number=CC0402MRX5R6BB106, Mount="Surface Mount", Packaging="Tape and Reel", Pricing 1="10000=0.02650, 20000=0.02590, 30000=0.02550, 40000=0.02530, 50000=0.02450 (USD)", RoHS=Yes, RoHS Compliant=Yes, Stock 1=80000, Supplier 1="Future Electronics"
C137 C138 C141 C142 C144 C145 C146: library part GRM1555C1E330JA01D, "CAP CER 33PF 25V C0G/NP0 0402", Capacitance=33pF, Case Code (Imperial)=0402, Case Code (Metric)=1005, Dielectric=C0G, LCSC Part Number=C441758, Manufacturer=Murata, Max Operating Temperature=125°C, Min Operating Temperature=-55°C, Package Quantity=1, Supplier Part Number 1=490-6177-1-ND, Tolerance=5%, Voltage=25V, Case/Package=0402, ComponentLink1Description=https://www.murata.com/~/media/webrenewal/support/library/catalog/products/capacitor/mlcc/c02e.ashx?la=en-us&src-supplier=Digi-Key, ComponentLink1URL=https://www.murata.com/~/media/webrenewal/support/library/catalog/products/capacitor/mlcc/c02e.ashx?la=en-us&src-supplier=Digi-Key, ComponentLink2Description=http://www.mouser.com/ds/2/281/c02e-2905.pdf?src-supplier=Mouser, ComponentLink2URL=http://www.mouser.com/ds/2/281/c02e-2905.pdf?src-supplier=Mouser, ComponentLink3Description=http://psearch.murata.com/capacitor/product/GRM1555C1E330JA01%23.pdf?src-supplier=Avnet, ComponentLink3URL=http://psearch.murata.com/capacitor/product/GRM1555C1E330JA01%23.pdf?src-supplier=Avnet, Construction=Flat, Depth=0.5mm, Height=0.5mm, Item Type=Capacitor, Lead Free="Lead Free", Length=1mm, Manufacturer Part Number=GRM1555C1E330JA01D, Mount="Surface Mount", Packaging="Tape and Reel", Pricing 1="1=0.1, 10=0.034, 50=0.0184, 100=0.0151, 500=0.01078, 1000=0.00847, 2500=0.0077, 5000=0.00708 (USD)", Radiation Hardening=No, RoHS Compliant=Yes, Series=GRM, Stock 1=250773, Supplier 1=Digi-Key, Termination=SMD/SMT, Thickness=0.022inch, Voltage Rating=25V, Voltage Rating (DC)=25V, Width=0.02inch